# Altium PCB User_Interface.PcbDoc
Units mm, origin at the board's own origin, x right, y up, seen from the top; angles counter-clockwise.
Board outline 102 x 100 mm, 2 copper layers (Top Layer, Bottom Layer); 82 components, 47 nets, 227 pads, 52 vias.
Unrouted connection lines stored in the file: 4.
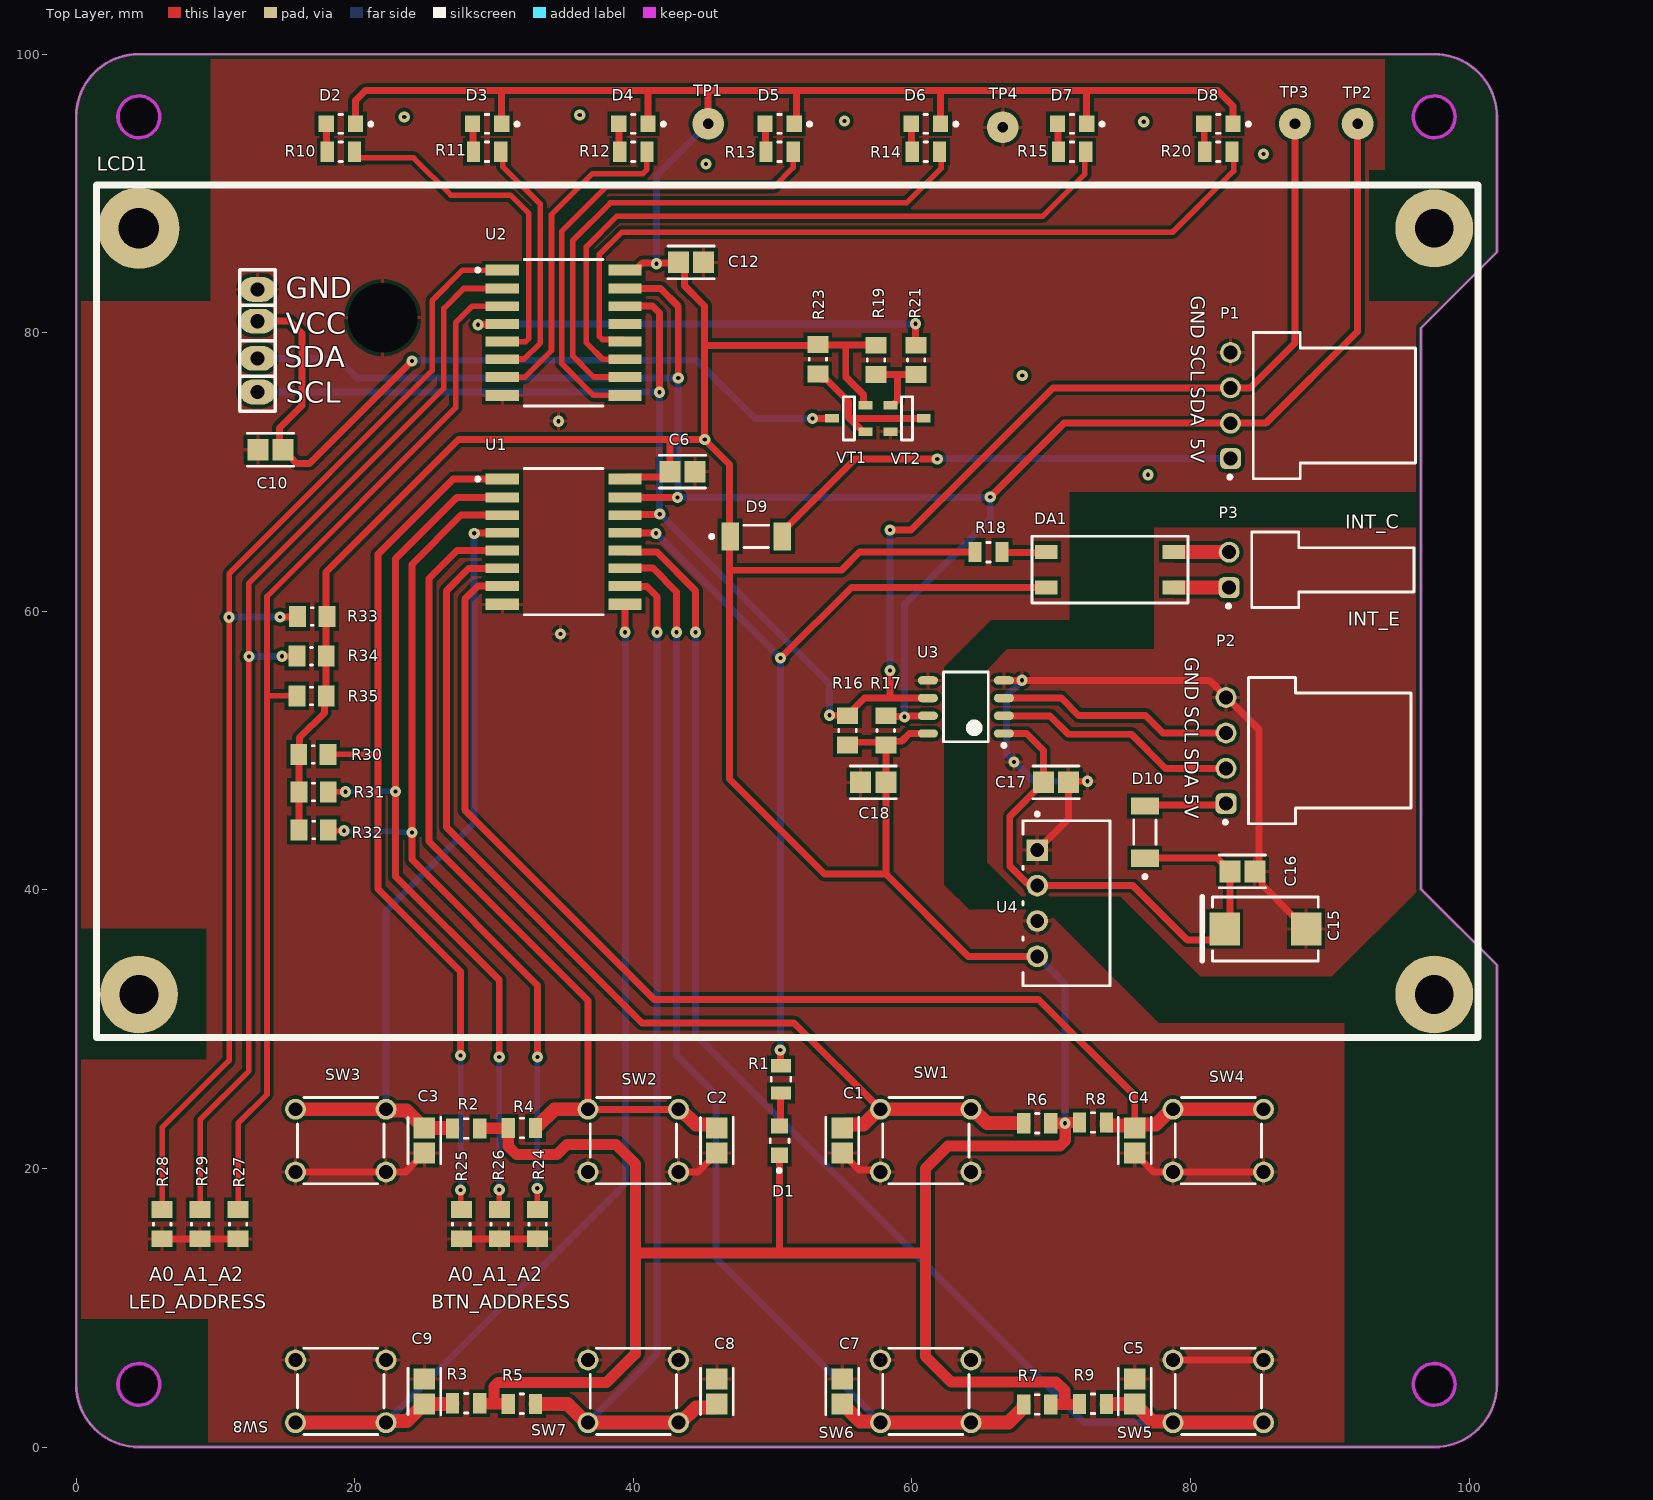
[diagram p0: Top Layer view]
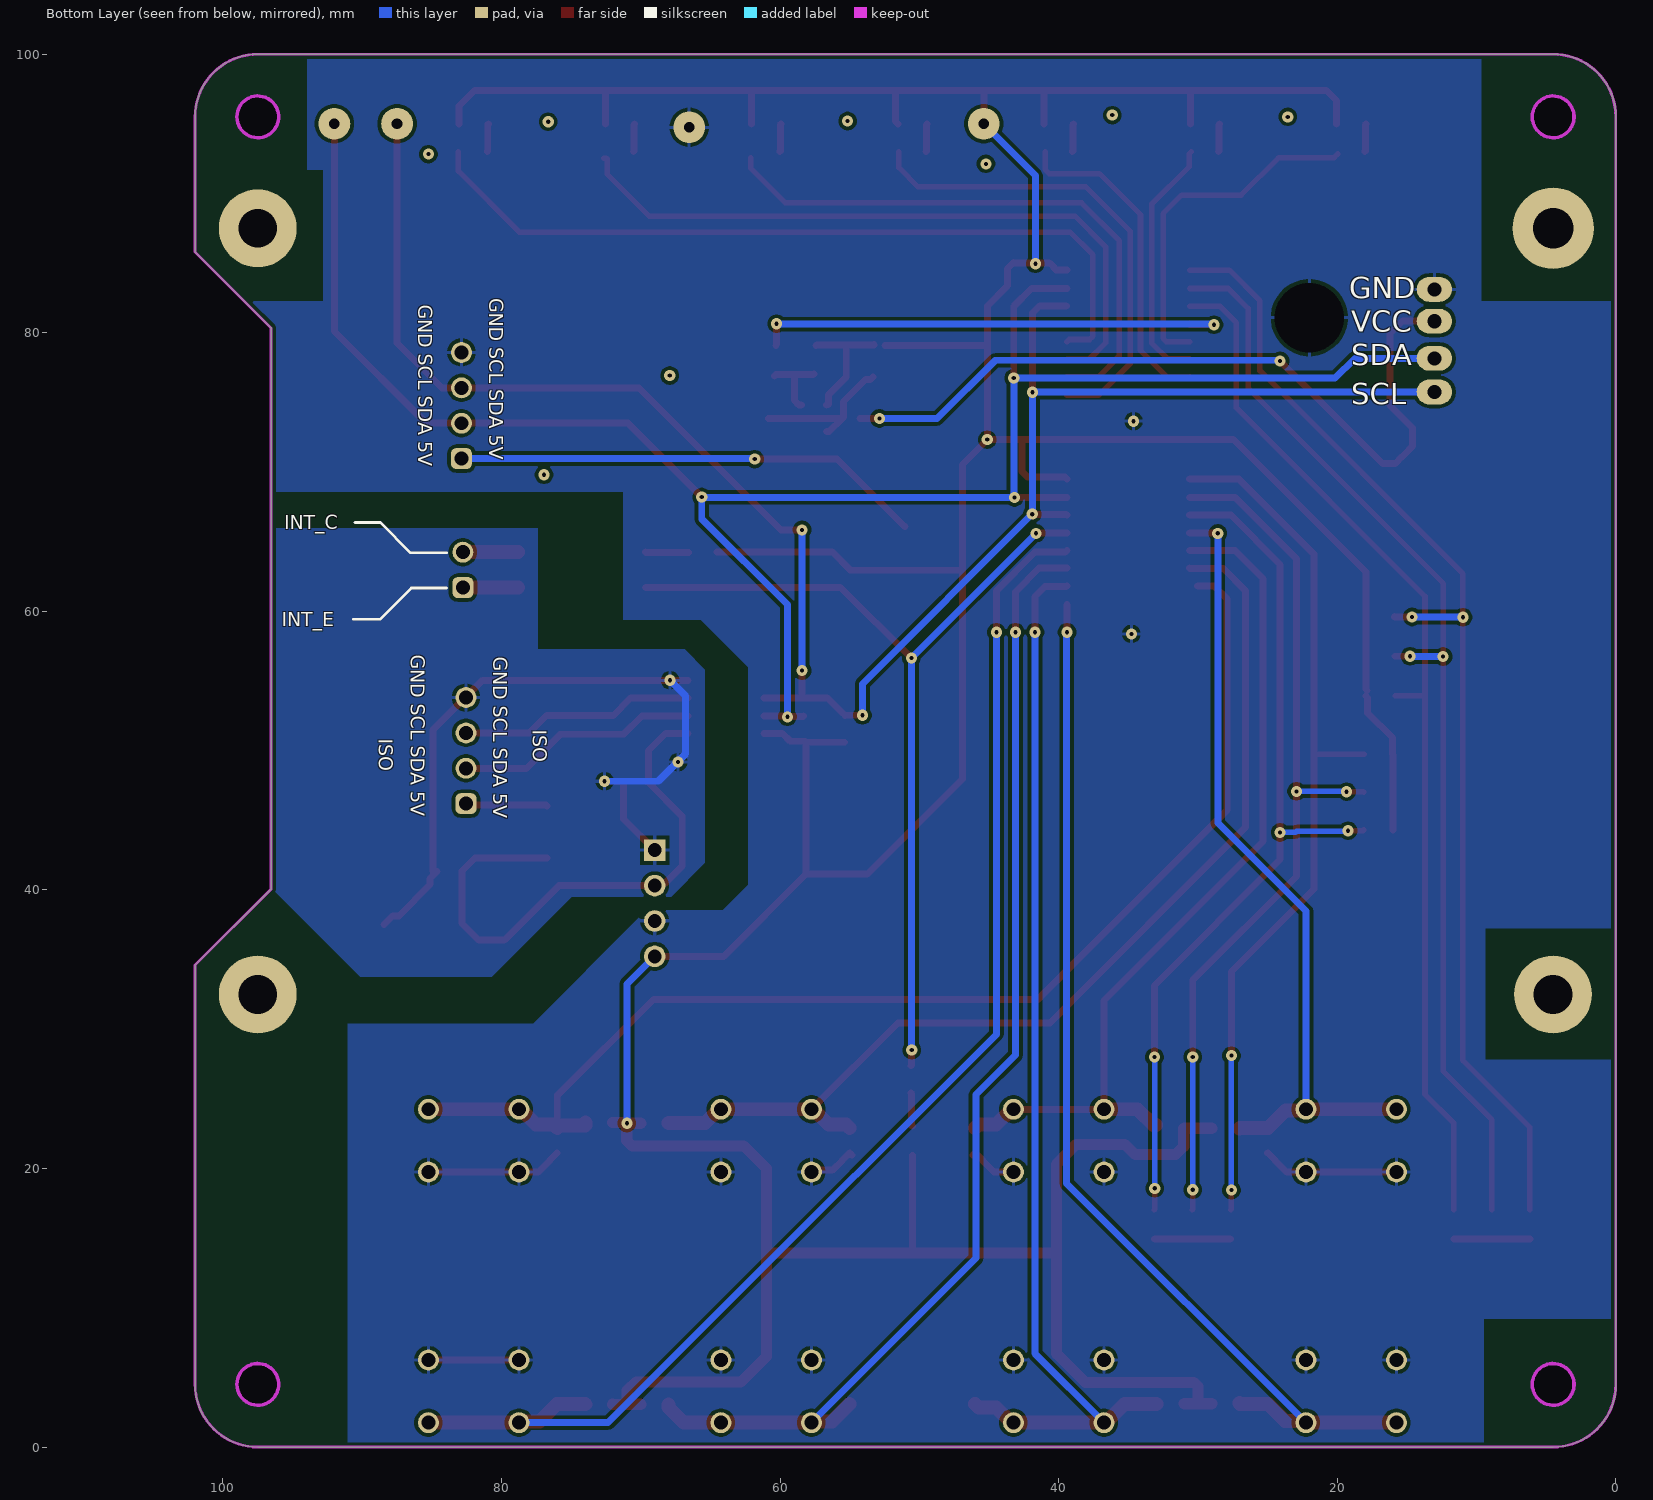
[diagram p1: Bottom Layer view, seen from below]
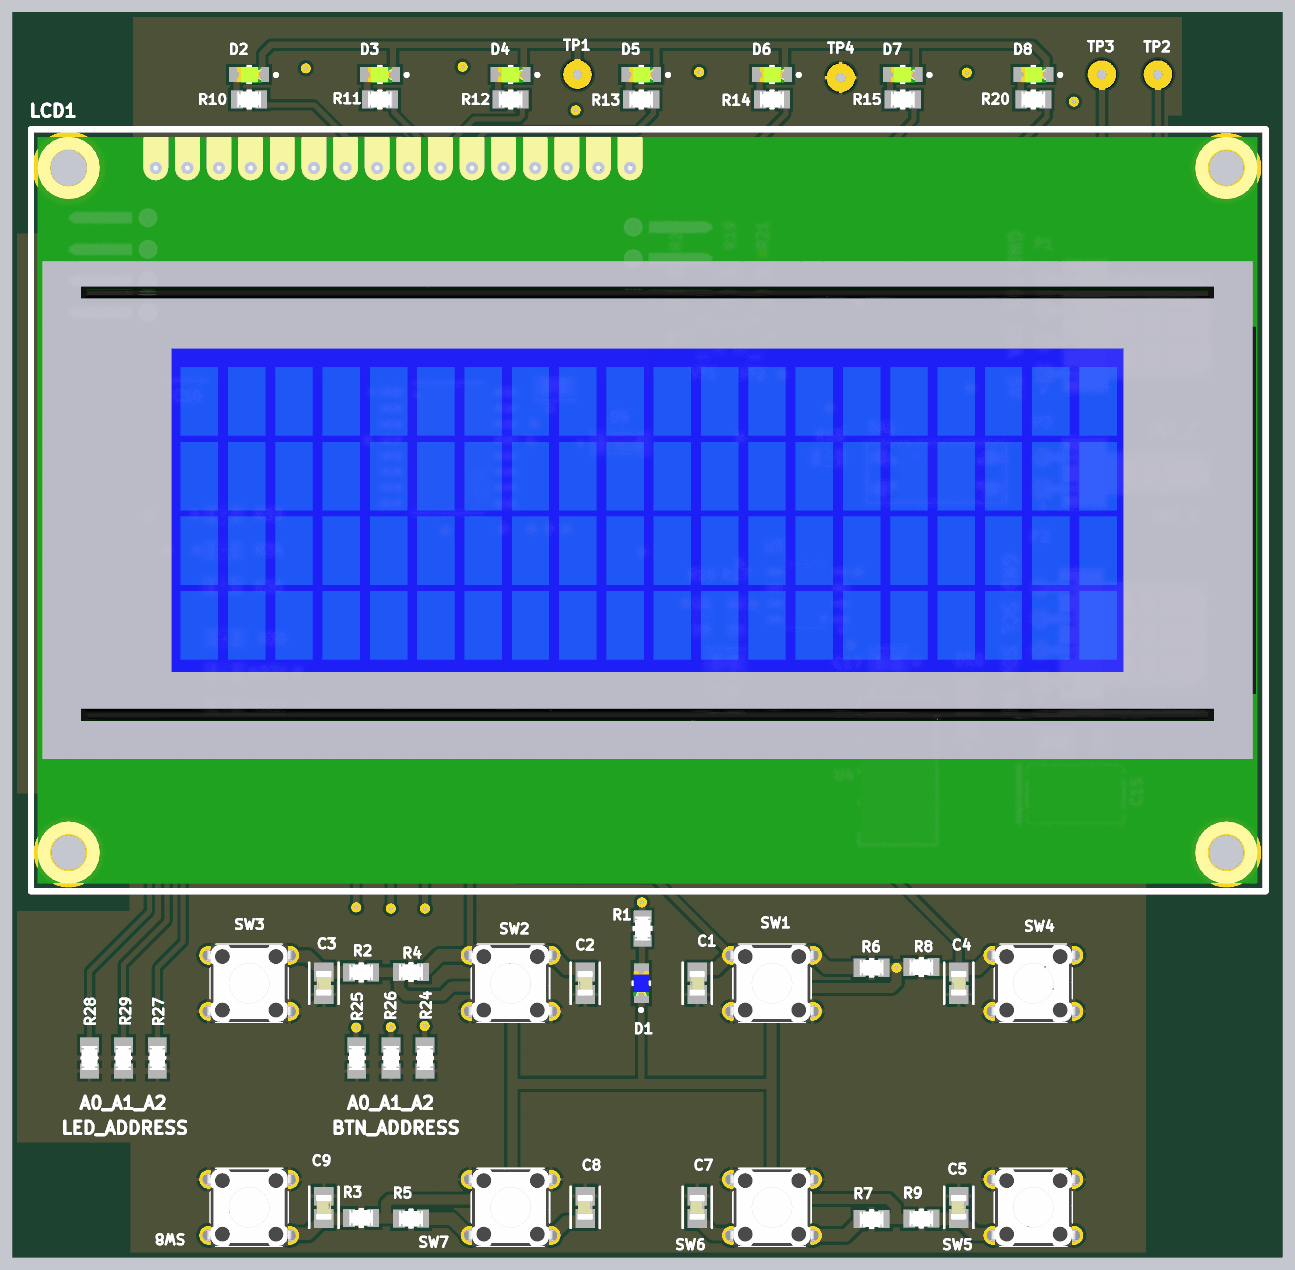
[diagram p2: 3D render of the assembled board from above, using the file's embedded part models]

## Layer stack, top to bottom
Top Solder: solder mask 0.0102, Solder Resist, Dk 3.5
Top Layer: signal copper 0.0356
Dielectric 1: dielectric 0.32, FR-4, Dk 4.8
Bottom Layer: signal copper 0.0356
Bottom Solder: solder mask 0.0102, Solder Resist, Dk 3.5

## Board outline
0,4.5 0,95.5 cw(c4.5,95.5) 4.5,100 97.5,100 cw(c97.5,95.5) 102,95.5 102,85.8 96.55,80.35 96.55,40.05 102,34.6 102,4.5 cw(c97.5,4.5) 97.5,0 4.5,0 cw(c4.5,4.5)
cut-out: 3,95.5 ccw(c4.5,95.5) 4.5,94 ccw(c4.5,95.5) 6,95.5 ccw(c4.5,95.5) 4.5,97 ccw(c4.5,95.5)
cut-out: 96,95.5 ccw(c97.5,95.5) 97.5,94 ccw(c97.5,95.5) 99,95.5 ccw(c97.5,95.5) 97.5,97 ccw(c97.5,95.5)
cut-out: 96,4.5 ccw(c97.5,4.5) 97.5,3 ccw(c97.5,4.5) 99,4.5 ccw(c97.5,4.5) 97.5,6 ccw(c97.5,4.5)
cut-out: 3,4.5 ccw(c4.5,4.5) 4.5,3 ccw(c4.5,4.5) 6,4.5 ccw(c4.5,4.5) 4.5,6 ccw(c4.5,4.5)

## Design rules (kind name [scope] priority, off if disabled: settings)
Clearance [All] p1: gap=0.254 ignorepadtopadclearanceinfootprint=FALSE except(0: Arc-Hole Track-Hole SMDPad-Hole THPad-Hole Via-Hole Fill-Hole Poly-Hole Region-Hole Text-Hole)
PlaneClearance [All] p1: clearance=0.2
PolygonConnect [All] p1: connectstyle=Relief reliefconductorwidth=0.254 reliefentries=4 polygonreliefangle="90 Angle" airgapwidth=0.254
RoutingVias [All] p1: holewidth=0.7 width=1.27 viastyle="Through Hole" minholewidth=0.2 minwidth=0.5 maxholewidth=0.7 maxwidth=1.27
SilkToSilkClearance [All] p1: silktosilkclearance=0.1
SilkToSolderMaskClearance [IsPad] p1: minsilkscreentomaskgap=0.05 clearancetoexposedcopper=FALSE
SolderMaskExpansion [All] p1: expansion=0 istentingtop=FALSE
Width [All] p1: maxlimit=5 minlimit=0.254 preferedwidth=0.5 minimp=50.000000 maximp=50.000000 favimp=50.000000
27 further rules are at their usual default settings.

## Components (designator, comment, footprint, x,y, rotation, side; value= is the part's Value field where it differs from the comment)
C1 "C0805C224K5RACTU" FP-C0805C-DN-IPC_A 55,22 r90 top locked value="0.22 μF"
C2 "C0805C224K5RACTU" FP-C0805C-DN-IPC_A 46,22 r90 top locked value="0.22 μF"
C3 "C0805C224K5RACTU" FP-C0805C-DN-IPC_A 25,22 r90 top locked value="0.22 μF"
C4 "C0805C224K5RACTU" FP-C0805C-DN-IPC_A 76,22 r90 top locked value="0.22 μF"
C5 "C0805C224K5RACTU" FP-C0805C-DN-IPC_A 76,4 r270 top value="0.22 μF"
C6 "C0805C224K5RACTU" FP-C0805C-DN-IPC_A 43.525,70.025 r180 top value="0.22 μF"
C7 "C0805C224K5RACTU" FP-C0805C-DN-IPC_A 55,4 r270 top locked value="0.22 μF"
C8 "C0805C224K5RACTU" FP-C0805C-DN-IPC_A 46,4 r270 top locked value="0.22 μF"
C9 "C0805C224K5RACTU" FP-C0805C-DN-IPC_A 25,4 r270 top value="0.22 μF"
C10 "C0805C224K5RACTU" FP-C0805C-DN-IPC_A 13.95,71.6 r0 top value="0.22 μF"
C12 "C0805C224K5RACTU" FP-C0805C-DN-IPC_A 44.15,85.05 r180 top value="0.22 μF"
C15 "293D106X9050E2TE3" VISH-293D-E_L 85.375,37.2 r0 top
C16 "C0805C224K5RACTU" FP-C0805C-DN-IPC_A 83.724,41.325 r180 top value="0.22 μF"
C17 "C0805C224K5RACTU" FP-C0805C-DN-IPC_A 70.35,47.725 r0 top value="0.22 μF"
C18 "C0805C224K5RACTU" FP-C0805C-DN-IPC_A 57.224,47.725 r180 top value="0.22 μF"
D1 "151031YS06000" LED_BLUE 50.5,22 r90 top
D2 "151031YS06000" LED_GREEN 19,95 r180 top locked
D3 "151031YS06000" LED_GREEN 29.5,95 r180 top locked
D4 "151031YS06000" LED_GREEN 40,95 r180 top locked
D5 "151031YS06000" LED_GREEN 50.5,95 r180 top locked
D6 "151031YS06000" LED_GREEN 61,95 r180 top locked
D7 "151031YS06000" LED_GREEN 71.5,95 r180 top locked
D8 "151031YS06000" LED_GREEN 82,95 r180 top
D9 "LL4448-GS08" FP-6_560-5005_01-4-MFG 48.825,65.375 r0 top value=4pF
D10 "LL4448-GS08" FP-6_560-5005_01-4-MFG 76.725,44.15 r90 top value=4pF
DA1 "PC817" 4-SMD 74.225,62.995 r0 top locked
LCD1 "2004_I2C" LCD2004_I2C 51,60 r0 top locked
P1 "61900411021" 61900411021 90.325,74.775 r90 top
P2 "61900411021" 61900411021 90,50 r90 top locked
P3 "61900211021" 61900211021 90.225,62.975 r90 top
R1 "360" FP-CRCW0805-e3-MFG 50.6,26.4 r90 top
R2 "100K" FP-CRCW0805-e3-MFG 28,22.875 r0 top locked
R3 "100K" FP-CRCW0805-e3-MFG 28,3.15 r0 top locked
R4 "100K" FP-CRCW0805-e3-MFG 32,22.9 r180 top locked
R5 "100K" FP-CRCW0805-e3-MFG 32,3.1 r180 top locked
R6 "100K" FP-CRCW0805-e3-MFG 69,23.25 r0 top locked
R7 "100K" FP-CRCW0805-e3-MFG 69,3.05 r0 top
R8 "100K" FP-CRCW0805-e3-MFG 73,23.3 r180 top locked
R9 "100K" FP-CRCW0805-e3-MFG 73,3.1 r180 top
R10 "360" FP-CRCW0805-e3-MFG 19,93 r0 top locked
R11 "360" FP-CRCW0805-e3-MFG 29.5,93 r0 top locked
R12 "360" FP-CRCW0805-e3-MFG 40,93 r0 top locked
R13 "360" FP-CRCW0805-e3-MFG 50.5,93 r0 top locked
R14 "360" FP-CRCW0805-e3-MFG 61,93 r0 top locked
R15 "360" FP-CRCW0805-e3-MFG 71.5,93 r0 top locked
R16 "1K" Vishay_CRCW0805-e3_IPC_A 55.375,51.45 r270 top locked
R17 "1K" Vishay_CRCW0805-e3_IPC_A 58.125,51.45 r270 top locked
R18 "1k" FP-CRCW0805-e3-MFG 65.5,64.25 r0 top
R19 "10K" Vishay_CRCW0805-e3_IPC_A 57.425,78.05 r90 top
R20 "360" FP-CRCW0805-e3-MFG 82,93 r0 top locked
R21 "1K" Vishay_CRCW0805-e3_IPC_A 60.3,78.05 r90 top
R23 "10K" Vishay_CRCW0805-e3_IPC_A 53.25,78.1 r270 top
R24 "1K" Vishay_CRCW0805-e3_IPC_A 33.125,16 r270 top locked
R25 "1K" Vishay_CRCW0805-e3_IPC_A 27.65,16 r270 top locked
R26 "1K" Vishay_CRCW0805-e3_IPC_A 30.4,16 r270 top locked
R27 "1K" Vishay_CRCW0805-e3_IPC_A 11.625,16 r270 top locked
R28 "1K" Vishay_CRCW0805-e3_IPC_A 6.175,16 r270 top locked
R29 "1K" Vishay_CRCW0805-e3_IPC_A 8.9,16 r270 top locked
R30 "4K7" Vishay_CRCW0805-e3_IPC_A 17.025,49.725 r180 top
R31 "4K7" Vishay_CRCW0805-e3_IPC_A 17.049,47.025 r180 top
R32 "4K7" Vishay_CRCW0805-e3_IPC_A 17.05,44.3 r180 top
R33 "4K7" Vishay_CRCW0805-e3_IPC_A 16.95,59.625 r0 top
R34 "4K7" Vishay_CRCW0805-e3_IPC_A 16.9,56.775 r0 top
R35 "4K7" Vishay_CRCW0805-e3_IPC_A 16.9,53.925 r0 top
SW1 "430156043726" 4301x60437x6 61,22 r180 top locked
SW2 "430156043726" 4301x60437x6 40,22 r180 top locked
SW3 "430156043726" 4301x60437x6 19,22 r180 top locked
SW4 "430156043726" 4301x60437x6 82,22 r180 top locked
SW5 "430156043726" 4301x60437x6 82,4 r0 top locked
SW6 "430156043726" 4301x60437x6 61,4 r0 top locked
SW7 "430156043726" 4301x60437x6 40,4 r0 top locked
SW8 "430156043726" 4301x60437x6 19,4 r0 top locked
TP1 "Test_Point_PCB" Test_Point#1 45.375,96.125 r0 top
TP2 "Test_Point_PCB" Test_Point#2 92,95.85 r0 top
TP3 "Test_Point_PCB" Test_Point#3 87.5,95.975 r0 top
TP4 "Test_Point_PCB" Test_Point#4 66.525,94.75 r0 top
U1 "PCF8574T/3,518" FP-SOT162-1-MFG 35,65 r0 top locked
U2 "PCF8574T/3,518" FP-SOT162-1-MFG 35,80 r0 top locked
U3 "ADuM1250ARZ" ADI-R-8_N 63.875,53.135 r180 top locked
U4 "B0505S-1WR3" FP-B0505S-1WR3-MFG 71.1,39.04 r270 top locked
VT1 "MOSFET-P-CH" SOT23-3 55.475,73.85 r180 top
VT2 "BC847-BEC" SOT23-3 59.65,73.85 r0 top

## Footprints (in the part's own frame and the unit in brackets; to place one, negate y for a bottom-side part, rotate by r counter-clockwise, add the part's x,y. Pads: shape width x height; smd on the part's side, far side on the other; paste and mask are expansions set on the pad)
4-SMD [mm]
  rect 1.6x1 smd: 1(-4.575,1.27) 2(-4.575,-1.27) 3(4.575,-1.27) 4(4.575,1.27)
  silkscreen extent -5.6,-2.4 5.6,2.4, body extent -5,-2.29 5,2.29, height 3.85
4301x60437x6 [mm] "6x6mm Tact Switch, THT version"
  round 1.5 hole 1: A1(-3.25,2.25) A2(3.25,2.25) B1(-3.25,-2.25) B2(3.25,-2.25)
  silkscreen extent -3.1,-3.1 3.1,3.1, body extent -3.95,-3.1 3.95,3.1, height 4.35
61900211021 [mm] "2.54mm Male Left Angled Header Bottom Locking, 2p"
  rrect50% 1.5x1.5 hole 1: 1(-1.27,7.45)
  round 1.5 hole 1: 2(1.27,7.45)
  silkscreen extent -2.72,-5.82 2.71,7.62, body extent -2.54,-5.75 2.54,7.77, height 5.83
61900411021 [mm] "2.54mm Male Left Angled Header Bottom Locking, 4p"
  rrect50% 1.5x1.5 hole 1: 1(-3.81,7.45)
  round 1.5 hole 1: 2(-1.27,7.45) 3(1.27,7.45) 4(3.81,7.45)
  silkscreen extent -5.26,-5.82 5.25,7.62, body extent -5.08,-5.75 5.08,7.77, height 5.83
ADI-R-8_N [mm] "SOIC, 8-Leads, Body 5x4mm, Pitch 1.27mm, IPC Medium Density"
  oval 1.45x0.6 smd: 1(-2.725,1.905) 2(-2.725,0.635) 3(-2.725,-0.635) 4(-2.725,-1.905) 5(2.725,-1.905) 6(2.725,-0.635) 7(2.725,0.635) 8(2.725,1.905)
  silkscreen extent -2.85,-2.5 1.6,2.88, body extent -3,-2.5 3,2.5, height 1.75
FP-6_560-5005_01-4-MFG [mm]
  rect 1.25x2 smd paste+0 mask+0: 1(-1.875,0) 2(1.875,0)
  silkscreen extent -3.32,-0.8 0.87,0.8, body extent -2.6,-1.1 2.6,1.1, height 0.25
FP-B0505S-1WR3-MFG [mm]
  rect 1.55x1.55 hole 1 paste-1000 mask+0: 1(-3.81,-2.1)
  round 1.55 hole 1 paste-1000 mask+0: 2(-1.27,-2.1) 3(1.27,-2.1) 4(3.81,-2.1)
  silkscreen extent -6.52,-3.13 5.92,3.13, body extent -6.02,-3.22 6.02,3.22, height 0.25
FP-C0805C-DN-IPC_A [mm]
  rect 1.505x1.556 smd paste+0 mask+0: 1(-0.901,0) 2(0.901,0)
  silkscreen extent -1.65,-1.18 1.65,1.18, body extent -1,-0.63 1,0.63, height 0.88
FP-CRCW0805-e3-MFG [mm]
  rect 0.95x1.45 smd paste+0 mask+0: 1(-0.975,0) 2(0.975,0)
  silkscreen extent -0.13,-0.7 0.13,0.7, body extent -1.55,-0.82 1.55,0.82, height 0.25
FP-SOT162-1-MFG [mm]
  rect 2.4x0.8 smd paste+0 mask+0: 1(-4.4,4.495) 8(-4.4,-4.495) 9(4.4,-4.495) 16(4.4,4.495)
  rect 2.4x0.7 smd paste+0 mask+0: 2(-4.4,3.175) 3(-4.4,1.905) 4(-4.4,0.635) 5(-4.4,-0.635) 6(-4.4,-1.905) 7(-4.4,-3.175) 10(4.4,-3.175) 11(4.4,-1.905) 12(4.4,-0.635) 13(4.4,0.635) 14(4.4,1.905) 15(4.4,3.175)
  silkscreen extent -6.29,-5.25 2.83,5.25, body extent -5.15,-5.15 5.15,5.15, height 2.65
LCD2004_I2C [mil]
  round 220 hole 110: 0(-1830.71,-1082.68) 0(1830.71,-1082.68) 0(1830.71,1082.68)
  round 230 hole 115: 0(-1830.71,1082.68)
  round 60 hole 196.85 unplated: 0(-1141.73,830)
  oval 100x70 hole 40: 1(-1495,910) 2(-1495,820) 3(-1495,715) 4(-1495,620)
  silkscreen extent -1950,-1205 1955,1205, body extent -1929,-1181 1929,1181, height 1189
LED_BLUE [mm]
  rect 1.1x1.2 smd paste+0 mask+0: 1(-1.05,0) 2(1.05,0)
  silkscreen extent -2.27,-0.67 0.13,0.67, body extent -1,-0.63 1,0.63, height 0.8
LED_GREEN [mm]
  rect 1.1x1.2 smd paste+0 mask+0: 1(-1.05,0) 2(1.05,0)
  silkscreen extent -2.28,-0.67 0.13,0.67, body extent -1,-0.63 1,0.63, height 0.8
SOT23-3 [mm]
  rect 1x0.6 smd: 1(-1.2,0.95) 2(-1.2,-0.95) 3(1.2,0)
  silkscreen extent -0.4,-1.55 0.4,1.55, body extent -1.25,-1.46 1.23,1.46, height 1.02
Test_Point#1 [mil]
  round 90 hole 30 paste+4 mask+4: 1(0,-44.29)
Test_Point#2 [mil]
  round 90 hole 30 paste+4 mask+4: 1(0,-33.46)
Test_Point#3 [mil]
  round 90 hole 30 paste+4 mask+4: 1(0,-38.39)
Test_Point#4 [mil]
  round 90 hole 30 unplated paste+4 mask+4: 1(0,0)
VISH-293D-E_L [mm] "Molded Capacitor, 2-Leads, Body 7.6x4.6mm, IPC High Density"
  rect 2.2x2.35 smd: 1(-2.925,0) 2(2.925,0)
  silkscreen extent -4.52,-2.3 3.8,2.3, body extent -4.02,-2.3 4.02,2.3, height 4.3
Vishay_CRCW0805-e3_IPC_A [mil]
  rect 47.5x59.38 smd paste+0 mask+0: 1(-41.37,0) 2(41.37,0)
  silkscreen extent -3,-25 3,25, body extent -85,-49 85,49, height 10

## Part data
C1 C2 C3 C4 C5 C6 C7 C8 C9 C10 C12 C16 C17 C18: library part CMP-1036-04552-2, "CAP CER 0.22UF 50V X7R 0805", Capacitance="0.22 μF", Manufacturer=KEMET, Package=C0805C-DN, Temperature="-55°C to +125°C", Temperature Characteristic=X7R, Temperature Coefficient=30ppm/°C, Temperature Range High=+125°C, Temperature Range Low=-55°C, Tolerance=0.1, Voltage Rating="50 V", Automotive=No, Category=Cap, ComponentLink2Description=Datasheet, ComponentLink2URL=https://content.kemet.com/datasheets/KEM_C1003_C0G_SMD.pdf, Device Class L1="Passive Components", Device Class L2=Capacitors, Device Class L3="Ceramic Capacitors", Digikey Description="CAP CER 0.22UF 50V X7R 0805", Height=0.88mm, Ipc Land Pattern Name=CAPC200125X78, Lead Free=Yes, Manufacturer Part Number=C0805C224K5RACTU, Material=Ceramic, Mouser Description="CAP CER 0.22UF 50V X7R 0805", Octopart=https://octopart.com/c0805c224k5ractu-kemet-144670, RoHS=TRUE
C15: library part CMP-2000-05556-1, "Tantalum Capacitor, 10 uF, +/- 10%, 50 V, -55 to 125 degC, 2-Pin SMD (7343-43), RoHS, Tape and Reel", Capacitance=10000000pF, Case Code=E, Case Style=Molded, Manufacturer=Vishay, Operating Temp Range=-55Cto125C, Package / Case=7343-43, Package Description="2-Pin Surface Mount Device, Body 7.3 x 4.3 mm", Package Reference=293D-E, Tolerance (+ or -)=10%, Voltage=50VDC, Construction=SMTChip, Datasheet URL=http://www.vishay.com/docs/40002/293d.pdf, Datasheet Version=08/2016, DCL=5uA, DELETED=Compliant, DF=6%, ESR=0.8ohm, Failure Rate=NotRequired, Insulation=NotRequired, Lead Spacing (nom)=NotRequiredmm, Length W/Weld=NotRequiredmm, Length W/Weld (max)=NotRequiredmm, Manufacturer URL=http://www.vishay.com/, Mounting Style=SurfaceMount, Mounting Technology=SurfaceMount, Packaging=TapeandReel, Polarity=Polar, Product Depth (mm)=4.3mm, Product Diameter (mm)=NotRequiredmm, Product Height (mm)=4mm, Product Length (mm)=7.3mm, Rad Hardened=No, Seal=NotRequired, Seated Plane Height=NotRequiredmm, Wire Form=NotRequired
D1 D2 D3 D4 D5 D6 D7 D8: "WURTH ELEKTRONIK - 151031YS06000 - LED, Yellow, Through Hole, T-1 (3mm), 30 mA, 2 V, 590 nm", Manufacturer_Name="Wurth Elektronik", Mouser Part Number=710-151031YS06000, Datasheet Link=https://katalog.we-online.de/led/datasheet/151031YS06000.pdf, Geometry.Height=5.5mm, Manufacturer_Part_Number=151031YS06000, Mouser Price/Stock=https://www.mouser.co.uk/ProductDetail/Wurth-Elektronik/151031YS06000?qs=LlUlMxKIyB3xSYYW%252BcuBiQ%3D%3D
D9 D10: library part CMP-249167-000001-1, "DIODE GEN PURP 75V 150MA SOD80", Capacitance=4pF, Forward Current=300mA, Manufacturer="Vishay Small Signal", Max Junction Temp=+175°C, Max Repetitive Reverse Voltage=100V, Max Surge Forward Current=2A, Package=6.560-5005.01-4, Peak Reverse Current=5uA, Reverse Voltage=75V, Temperature="to +175°C", Automotive=Yes, Automotive Grade="Grade 0", Category=Diode, ComponentLink2Description=Datasheet, ComponentLink2URL=http://www.vishay.com/docs/85557/ll4148.pdf, Device Class L1="Discrete Semiconductors", Device Class L2=Diodes, Device Class L3="Rectifier Diodes", Digikey Description="DIODE GEN PURP 75V 150MA SOD80", Height=1.6mm, Lead Free=Yes, Manufacturer Part Number=LL4448-GS08, Mouser Description="Diodes - General Purpose, Power, Switching 100 Volt 100mA", Octopart=https://octopart.com/ll4448-gs08-vishay+small+signal-40886, RoHS=TRUE, Temperature Range High=+175°C
LCD1: library part LCD2004_I2C
P1 P2: "WR-WTB THT Male Left Angled Bottom Locking Header, pitch 2.54mm, 4pins", Contact Resistance=20mΩ, Manufacturer="Wurth Elektronik", Operating Temperature Max=105°C, Operating Temperature Min=-40°C, Rated Current=3A, Withstanding Voltage=1000VAC, Working Voltage=250VAC, Category="Wire-to-Board Connectors", ComponentLink1Description="Website Link", ComponentLink1URL=https://www.we-online.com/redexpert/article/61900411021?ad, ComponentLink2Description="Datasheet Link", ComponentLink2URL=https://www.we-online.com/redexpert/spec/61900411021?ad, Gender=Male, Height=5.8mm, Length=10.16mm, Manufacturer Part Number=61900411021, Match Code=WR-WTB, Mount="Through Hole", Number of Pins=4, Number of Rows=1, Orientation="Right Angled Bottom Locking", Packaging=Bag, Pitch=2.54mm, Width=12.47mm
P3: "WR-WTB THT Male Left Angled Bottom Locking Header, pitch 2.54mm, 2pins", Contact Resistance=20mΩ, Manufacturer="Wurth Elektronik", Operating Temperature Max=105°C, Operating Temperature Min=-40°C, Rated Current=3A, Withstanding Voltage=1000VAC, Working Voltage=250VAC, Category="Wire-to-Board Connectors", ComponentLink1Description="Website Link", ComponentLink1URL=https://www.we-online.com/redexpert/article/61900211021?ad, ComponentLink2Description="Datasheet Link", ComponentLink2URL=https://www.we-online.com/redexpert/spec/61900211021?ad, Gender=Male, Height=5.8mm, Length=5.08mm, Manufacturer Part Number=61900211021, Match Code=WR-WTB, Mount="Through Hole", Number of Pins=2, Number of Rows=1, Orientation="Right Angled Bottom Locking", Packaging=Bag, Pitch=2.54mm, Width=12.47mm
R1 R10 R11 R12 R13 R14 R15 R18 R20: library part CMP-2001-04908-2, "RES Thick Film, 200Ω, 1%, 0.125W, 100ppm/°C, 0805", Case Code (Imperial)=0805, Case Code (Metric)=2012, Max Operating Temperature=155°C, Min Operating Temperature=-55°C, Package Quantity=5000, Power Rating=125mW, Resistance=10kR, Temperature Coefficient=100ppm/°C, Tolerance=1%, Voltage Rating=150V, Case/Package=0805, Composition="Thick Film", Contact Plating=Tin, Depth=1.25mm, Height=0.45mm, Lead Free="Lead Free", Length=2mm, Military Standard=Not, Packaging="Tape and Reel", Radiation Hardening=No, Termination=SMD/SMT, Voltage Rating (DC)=150V, Weight=0.000194oz, Width=1.25mm
R2 R3 R4 R5 R6 R7 R8 R9: library part CMP-2001-04908-2, "RES Thick Film, 100kΩ, 1%, 0.125W, 100ppm/°C, 0805", Case Code (Imperial)=0805, Case Code (Metric)=2012, Max Operating Temperature=155°C, Min Operating Temperature=-55°C, Package Quantity=5000, Power Rating=125mW, Resistance=10kR, Temperature Coefficient=100ppm/°C, Tolerance=1%, Voltage Rating=150V, Case/Package=0805, Composition="Thick Film", Contact Plating=Tin, Depth=1.25mm, Height=0.45mm, Lead Free="Lead Free", Length=2mm, Military Standard=Not, Packaging="Tape and Reel", Radiation Hardening=No, Termination=SMD/SMT, Voltage Rating (DC)=150V, Weight=0.000194oz, Width=1.25mm
R16 R17 R19 R21 R23 R24 R25 R26 R27 R28 R29 R30 R31 R32 R33 R34 R35: library part CRCW08050000Z0EA
SW1 SW2 SW3 SW4 SW5 SW6 SW7 SW8: "WS-TATV THT Tact Switch 6x6mm, SPST-NO, 12VDC, 50mA, 260g", Manufacturer="Wurth Elektronik", Operating Temperature Max=85°C, Operating Temperature Min=-40°C, Rated Current=50mA, Rated Voltage=12VDC, Category="Tact Switches", Circuit=SPST-NO, ComponentLink1Description="Website Link", ComponentLink1URL=https://www.we-online.com/redexpert/article/430156043726?ad, ComponentLink2Description="Datasheet Link", ComponentLink2URL=https://www.we-online.com/redexpert/spec/430156043726?ad, Contact Material="Stainless Steel", Contact Plating=Silver, Height=4.3mm, Length=6mm, Manufacturer Part Number=430156043726, Match Code=WS-TATV, Mount="Through Hole", Operation Force=260g, Packaging=Bulk, Terminal Material="Copper Alloy", Terminal Plating=Silver, Washable=No, Width=6mm
TP1 TP2 TP3 TP4: library part TP_PCB?, "Test_Point"
U1 U2: library part CMP-10112-000010-1, "IC I/O EXPANDER I2C 8B 16SOIC", Ambient Temperature Range High=+85°C, Ambient Temperature Range Low=-40°C, Frequency=100kHz, Manufacturer="NXP Semiconductors", Max Junction Temp=+125°C, Max Supply Voltage=6V, Min Supply Voltage=2.5V, Nominal Supply Current=40uA, Package=SOT162-1, Temperature="-40°C to +85°C", Automotive=No, Category=IC, ComponentLink2Description=Datasheet, ComponentLink2URL=https://www.nxp.com/docs/en/data-sheet/PCF8574_PCF8574A.pdf, Device Class L1="Integrated Circuits (ICs)", Device Class L2="Interface ICs", Device Class L3="I/O Expanders", Digikey Description="IC I/O EXPANDER I2C 8B 16SOIC", Footprint Url=https://www.nxp.com/docs/en/package-information/SOT162-1.pdf, Height=2.65mm, Interface=I2C, Ipc Land Pattern Name=SOIC127P1032X265-16, Lead Free=Yes, Manufacturer Part Number=PCF8574T/3,518, Mouser Description="PCF8574 Series 2.5 - 6V Remote 8-bit I/O Expander for I2C-bus - SOIC-16", Number Of I/Os=8, Octopart=https://octopart.com/pcf8574t%2F3%2C518-nxp+semiconductors-10470852, RoHS=TRUE, Standoff Height=0.1mm, Temperature Range High=+85°C, Temperature Range Low=-40°C
U3: library part CMP-0534-00654-1, "Hot Swappable, Dual I2C Isolator, 3 to 5.5 V, -40 to 105 degC, 8-Pin SOIC (R-8), RoHS, Tube", Generic Part Number=ADUM1250, Supply Voltage Max="5.5 V", Supply Voltage Min="3 V", Temperature Max="105 degC", Temperature Min="-40 degC", Code_JEDEC=MS-012-AA, ComponentLink1Description="Manufacturer URL", ComponentLink1URL=http://www.analog.com/, ComponentLink2Description=Datasheet, ComponentLink2URL=http://www.analog.com/media/en/technical-documentation/data-sheets/ADUM1250_1251.pdf, Data Rate="1 Mbps", DatasheetVersion="Rev. H", Mounting Technology="Surface Mount", PackageDescription="8-Pin Small Outline Package, Body 4.9 x 3.9 mm, Pitch 1.27 mm", Packing=Tube, PartNumber=ADuM1250ARZ, RoHS=TRUE
U4: library part B0505s-1W, "DC DC Converter 5V 1W"

## Via types
v1: diameter 0.8, hole 0.3, Top Layer to Bottom Layer, 52 vias

## Nets (pads, with @x,y where several pads share a name; then routed paths per layer and width w, separated by ;. In a path a pad name is that pad's centre, name@x,y a point inside that pad or via, vN(x,y) a via of type N, cw(c..) or ccw(c..) an arc to the next point about the centre after c; other vN are vias at no path point)
+5V: C6.2 C12.2 C18.1 D1.1 D2.1 D3.1 D4.1 D5.1 D6.1 D7.1 D8.1 D9.1 R2.2 R3.2 R4.2 R5.2 R6.2 R7.2 R8.2 R9.2 R16.2 R17.2 R18.1 R19.2 R23.1 R30.2 R31.2 R32.2 R33.2 R34.2 R35.2 TP1.1 U1.16 U2.16 U3.8 U4.4 VT1.2 | length 394
  Top Layer w0.5: R32.2 15.999,49.725 16.036,49.762 16.036,50.936 17.814,52.714 17.814,53.788 R35.2 ; R35.2@17.85,54.324 17.951,54.425 R34.2 17.951,62.826 27.45,72.325 v1(45.125,72.325) ; D2.1 20.05,96.675 20.775,97.4 30.575,97.4 ; D3.1 30.55,97.375 30.575,97.4 ; U1.16 39.55,69.645 42.244,69.645 C6.2 42.624,72.324 ; U2.16 40.2,84.495 40.35,84.645 40.35,84.707 40.643,85 v1@41.775,85 ; D4.1 41.05,97.225 41.225,97.4 ; v1(41.675,84.95) 41.756,84.95 41.818,85.012 43.202,85.012 C12.2@43.245,85.054 ; C12.2 43.675,84.624 43.675,83.375 45.125,81.925 45.125,79.1 ; TP1.1 45.375,97.3 45.475,97.4 ; 50.225,13.925 50.5,14.2 D1.1 ; D5.1 51.713,95.162 51.713,97.238 51.875,97.4 ; 52.461,79.1 45.125,79.1 ; R23.1 53.275,79.126 55.25,79.126 ; R16.2@55.375,50.599 58.125,50.599 58.197,50.671 59.271,50.671 59.83,51.23 U3.8 ; VT1.2 56.625,74.85 56.541,74.85 56.541,75.526 55.25,76.817 55.25,79.126 ; R19.2 57.4,79.126 55.25,79.126 ; C18.1 R17.2 ; C18.1@58.139,47.711 58.139,41.136 ; D6.1 62.05,97.375 62.075,97.4 ; R18.1 56.25,64.25 54.95,62.95 46.9,62.95 ; U4.4 64.045,35.23 58.139,41.136 ; D7.1 72.55,97.35 72.6,97.4 ; D8.1 83.05,96.275 81.925,97.4 72.6,97.4 ; 30.575,97.4 41.225,97.4 ; 41.225,97.4 45.475,97.4 ; v1(45.125,72.325) 46.9,70.55 46.9,62.95 ; v1(45.125,72.325) 45.125,79.1 ; 45.475,97.4 51.875,97.4 ; 46.9,62.95 46.9,47.975 53.739,41.136 58.139,41.136 ; 51.875,97.4 62.075,97.4 ; 62.075,97.4 72.6,97.4
  Top Layer w0.8: R3.2@28.987,3.113 30,3.113 ; R2.2@28.987,22.888 31,22.888 31.025,22.863 31.025,21.586 31.611,21 34.525,21 35.25,21.725 38.75,21.725 40.15,20.325 40.15,13.65 ; R5.2@31.012,3.113 30,3.113 ; R6.2@70,23.25 v1(71,23.25) ; 70.675,3.1 70,3.1 69.975,3.075 R7.2 72,3.05 72.025,3.075 R9.2 ; 70.975,3.291 70.975,4.05 70.35,4.675 62.8,4.675 60.975,6.5 60.975,13.925 ; R8.2 71.012,23.3 71.012,22.021 70.616,21.625 62.6,21.625 60.975,20 60.975,13.925 ; 30,3.113 30,4.341 30.284,4.625 38.075,4.625 40.15,6.7 40.15,13.65 ; 40.15,13.65 40.425,13.925 50.225,13.925 60.975,13.925
  Bottom Layer w0.5: v1(41.675,84.95) 41.675,91.3 TP1.1 ; U4.4@68.814,35.436 71,33.25 v1(71,23.25)
+5V_ISO: C15.1 C16.2 C17.1 D10.1 U3.1 U4.2 | length 41.4
  Top Layer w0.5: U3.1 68.22,51.23 69.449,50.001 69.449,47.699 67.025,45.275 67.025,41.725 68.239,40.511 68.799,40.511 U4.2 ; U4.2@69,40.3 75.875,40.3 79.77,36.405 81.655,36.405 82.823,37.573 82.823,41.351 81.899,42.275 D10.1
GND: C1.1 C2.1 C3.1 C4.1 C5.1 C6.1 C7.1 C8.1 C9.1 C10.1 C12.1 C18.2 LCD1.0 LCD1.1 P1.4 R24.2 R25.2 R26.2 R27.2 R28.2 R29.2 SW1.A1 SW1.A2 SW2.A1 SW2.A2 SW3.A1 SW3.A2 SW4.A1 SW4.A2 SW5.A1 SW5.A2 SW6.A1 SW6.A2 SW7.A1 SW7.A2 SW8.A1 SW8.A2 TP4.1 U1.8 U2.8 U3.5 U4.3 VT2.2 | length 44.1
  Top Layer w0.5: R28.2 R29.2 R27.2 ; SW3.A2 23.651,19.75 24.472,20.571 24.472,20.597 24.974,21.099 C3.1 ; R25.2 R26.2 R24.2 ; SW2.A1 44.651,19.75 45.472,20.571 45.472,20.597 45.974,21.099 C2.1 C2.1@46.149,20.95 ; C1.1@54.851,20.95 C1.1 55.026,21.099 55.528,20.597 55.528,20.571 56.224,19.875 57.625,19.875 SW1.A2 ; C4.1 76.026,21.099 76.528,20.597 76.528,20.571 77.349,19.75 SW4.A2 SW4.A1 ; SW5.A1 SW5.A2
  other v1: 34.775,58.375 34.625,73.65
GND_ISO: C15.2 C16.1 C17.2 P2.4 U3.4 U4.1 | length 55.2
  Top Layer w0.5: U3.4 v1@67.9,55.04 ; v1(67.9,55.05) 81.375,55.05 84.925,51.5 C16.1@84.925,41.325 ; U4.1 71.251,45.101 C17.2 71.326,47.8 v1(72.6,47.8) ; C16.1 84.775,41.175 85.127,40.823 85.127,40.373 87.375,38.125 87.825,38.125 C15.2@88.425,37.525
  Bottom Layer w0.5: v1(67.9,55.05) 66.775,53.925 66.775,49.775 68.75,47.8 v1(72.6,47.8)
  other v1: 67.325,49.175
NetC1_2: C1.2 R6.1 SW1.B1 SW1.B2 U1.6 | length 75.2
  Top Layer w0.5: U1.6 30.585,63.08 28.18,63.08 26.575,61.475 26.575,44.5 40.625,30.45 51.55,30.45 SW1.B2
  Top Layer w1: C1.2 55.252,23.153 56.518,23.153 57.615,24.25 SW1.B2 SW1.B1 64.385,24.25 65.385,23.25 R6.1
NetC2_2: C2.2 R4.1 SW2.B1 SW2.B2 U1.5 | length 63
  Top Layer w0.5: U1.5 27.34,64.365 25.325,62.35 25.325,43.475 36.75,32.05 SW2.B2 SW2.B1
  Top Layer w1: R4.1@33,23.125 33.2,23.125 34.325,24.25 SW2.B2 ; SW2.B1 43.385,24.25 44.482,23.153 45.748,23.153 C2.2
NetC3_2: C3.2 R2.1 SW3.B1 SW3.B2 U1.4 | length 57.9
  Top Layer w0.5: v1(28.575,65.6) 28.592,65.617 30.583,65.617 U1.4
  Top Layer w1: SW3.B2 SW3.B1 22.346,24.154 23.721,24.154 24.974,22.901 C3.2 27,22.901 R2.1
  Bottom Layer w0.5: SW3.B1 22.25,38.475 28.575,44.8 v1(28.575,65.6)
NetC4_2: C4.2 R8.1 SW4.B1 SW4.B2 U1.7 | length 88.7
  Top Layer w0.5: U1.7@30.025,61.825 28.85,61.825 27.9,60.875 27.9,45.725 41.5,32.125 69.1,32.125 76,25.225 C4.2
  Top Layer w1: R8.1 73.975,23.125 74,23.1 75.8,23.1 C4.2 76.252,23.153 77.518,23.153 78.615,24.25 SW4.B2 SW4.B1
NetC5_2: C5.2 R9.1 SW5.B1 SW5.B2 U1.12 | length 95.9
  Top Layer w0.5: U1.12 39.5,64.265 41.685,64.265 44.475,61.475 v1(44.475,58.5) v1@44.475,58.4
  Top Layer w1: R9.1@73.975,3.075 73.987,3.087 75.988,3.087 C5.2 76.026,3.099 77.279,1.846 78.654,1.846 SW5.B1 SW5.B2
  Bottom Layer w0.5: v1(44.475,58.5) 44.475,29.625 64.7,9.4 72.35,1.75 SW5.B1
NetC7_2: C7.2 R7.1 SW6.B1 SW6.B2 U1.11 | length 84.4
  Top Layer w0.5: U1.11 41.405,63.095 43.1,61.4 v1@43.1,58.45
  Top Layer w1: C7.2 55.026,3.099 56.279,1.846 57.654,1.846 SW6.B1 SW6.B2 66.925,1.75 68.025,2.85 R7.1
  Bottom Layer w0.5: v1@43.1,58.45 43.1,28.15 45.925,25.325 45.925,13.575 SW6.B1
  other v1: 43.1,58.5
NetC8_2: C8.2 R5.1 SW7.B1 SW7.B2 U1.10 | length 78.3
  Top Layer w0.5: U1.10 39.43,61.795 40.98,61.795 41.7,61.075 v1(41.7,58.5) v1@41.7,58.35
  Top Layer w1: R5.1 35.265,3.1 36.615,1.75 SW7.B1 SW7.B2 43.385,1.75 44.482,2.847 45.748,2.847 C8.2
  Bottom Layer w0.5: SW7.B1 41.7,6.7 v1(41.7,58.5)
NetC9_2: C9.2 R3.1 SW8.B1 SW8.B2 U1.9 | length 77.7
  Top Layer w0.5: v1@39.4,58.45 v1(39.4,58.5) U1.9
  Top Layer w1: SW8.B1 SW8.B2 22.375,1.875 23.75,1.875 24.974,3.099 C9.2 27,3.099 27.025,3.124 R3.1
  Bottom Layer w0.5: SW8.B2 39.425,18.925 39.425,58.425 v1@39.4,58.45
NetC10_2: C10.2 LCD1.2 VT1.3 | length 57.3
  Top Layer w0.5: LCD1.2 15.322,80.828 16.2,79.95 16.2,74.775 14.6,73.175 14.6,71.851 C10.2 14.851,71.574 15.353,71.072 15.379,71.072 15.826,70.625 16.75,70.625 v1(24.1,77.975) ; v1(52.875,73.85) VT1.3
  Bottom Layer w0.5: v1(24.1,77.975) 24.15,78.025 44.55,78.025 48.725,73.85 v1(52.875,73.85)
NetD1_2: D1.2 R1.1 | length 2.4
  Top Layer w0.5: D1.2 50.55,23.1 50.55,25.375 R1.1
NetD2_2: D2.2 R10.1 | length 2
  Top Layer w0.5: D2.2 17.988,94.962 17.988,93.037 R10.1
NetD3_2: D3.2 R11.1 | length 2
  Top Layer w0.5: D3.2 28.487,94.962 28.487,93.037 R11.1
NetD4_2: D4.2 R12.1 | length 2
  Top Layer w0.5: D4.2 38.987,94.962 38.987,93.037 R12.1
NetD5_2: D5.2 R13.1 | length 2
  Top Layer w0.5: D5.2 49.488,94.962 49.488,93.037 R13.1
NetD6_2: D6.2 R14.1 | length 2
  Top Layer w0.5: D6.2 59.988,94.962 59.988,93.037 R14.1
NetD7_2: D7.2 R15.1 | length 2
  Top Layer w0.5: D7.2 70.487,94.962 70.487,93.037 R15.1
NetD8_2: D8.2 R20.1 | length 2
  Top Layer w0.5: D8.2 80.988,94.962 80.988,93.037 R20.1
NetD9_2: D9.2 P1.1 | length 33.9
  Top Layer w0.5: D9.2@51.034,66.084 51.075,66.125 51.099,66.125 55.924,70.95 61.8,70.95 v1(61.825,70.925)
  Bottom Layer w0.5: v1(61.825,70.925) 61.865,70.965 P1.1
NetD10_2: D10.2 P2.1 | length 5.9
  Top Layer w0.5: D10.2 76.807,46.107 82.468,46.107 P2.1
NetDA1_1: DA1.1 R18.2 | length 3.1
  Top Layer w0.5: R18.2@66.557,64.233 69.618,64.233 DA1.1
NetDA1_2: DA1.2 R1.2 U1.13 | length 65.4
  Top Layer w0.5: U1.13 39.418,65.617 41.608,65.617 v1(41.625,65.6) ; v1(50.55,28.5) 50.575,28.475 50.575,27.4 R1.2 ; v1(50.575,56.65) 55.65,61.725 DA1.2
  Bottom Layer w0.5: v1(41.625,65.6) v1(50.575,56.65) 50.575,28.525 v1(50.55,28.5)
NetDA1_3: DA1.3 P3.1 | length 4
  Top Layer w0.5: DA1.3 DA1.3@78.81,61.715 ; P3.1@82.765,61.715 P3.1
  Top Layer w1: DA1.3@78.81,61.715 P3.1@82.765,61.715
NetDA1_4: DA1.4 P3.2 | length 4
  Top Layer w0.5: DA1.4 DA1.4@78.81,64.255 ; P3.2@82.765,64.255 P3.2
  Top Layer w1: DA1.4@78.81,64.255 P3.2@82.765,64.255
NetLCD1_3: LCD1.3 P1.2 R17.1 TP2.1 U1.15 U2.15 U3.7 | length 142.5
  Top Layer w0.5: U1.15 v1(43.175,68.175) ; U2.15 41.95,83.175 43.225,81.9 v1(43.225,76.75) ; R17.1@58.326,52.5 58.363,52.463 59.437,52.463 v1(59.475,52.425) 59.531,52.481 61.131,52.481 U3.7 ; v1(65.625,68.2) 70.93,73.505 P1.2 85.405,73.505 92,80.1 TP2.1
  Bottom Layer w0.5: LCD1.3 18.739,78.161 20.15,76.75 v1(43.225,76.75) 43.2,76.725 43.2,68.2 v1@43.187,68.187 ; v1(43.175,68.175) v1@43.187,68.187 ; v1(59.475,52.425) 59.475,60.475 65.625,66.625 v1(65.625,68.2) 65.612,68.187 v1@43.187,68.187
NetLCD1_4: LCD1.4 P1.3 R16.1 TP3.1 U1.14 U2.14 U3.6 | length 137.9
  Top Layer w0.3: U2.14 U2.14@39.422,81.927 ; R16.1@55.351,52.525 R16.1
  Top Layer w0.5: U1.14 39.435,66.94 41.865,66.94 v1(41.9,66.975) ; U2.14@39.422,81.927 39.435,81.915 U2.14@40.24,81.915 ; U2.14@40.24,81.905 41.382,81.905 41.875,81.412 v1(41.875,75.725) ; v1(54.087,52.538) 55.338,52.538 R16.1@55.351,52.525 ; R16.1@55.526,52.701 56.595,53.77 58.5,53.77 ; v1(58.425,55.75) 58.425,53.845 58.5,53.77 ; v1(58.425,65.85) 59.95,65.85 70.145,76.045 P1.3 84.27,76.045 87.5,79.275 TP3.1 ; U3.6 58.5,53.77
  Bottom Layer w0.5: LCD1.4 13.239,75.748 13.45,75.748 13.457,75.741 41.859,75.741 v1(41.875,75.725) 41.888,75.712 41.888,66.987 v1(41.9,66.975) 54.087,54.788 v1(54.087,52.538) ; v1(58.425,55.75) v1(58.425,65.85)
NetP2_2: P2.2 U3.2 | length 17.5
  Top Layer w0.5: U3.2 69.925,52.5 71.25,51.175 75.775,51.175 78.22,48.73 P2.2
NetP2_3: P2.3 U3.3 | length 17
  Top Layer w0.5: U3.3 70.73,53.77 71.972,52.528 76.772,52.528 78.03,51.27 P2.3
NetR10_2: R10.2 U2.5 | length 25.2
  Top Layer w0.4: R10.2@19.975,92.834 20.25,92.559 24.216,92.559 26.9,89.875 31.175,89.875 32.5,88.55 32.5,79.599 32.266,79.365 U2.5
NetR11_2: R11.2 U2.6 | length 18.1
  Top Layer w0.4: R11.2 30.637,92.838 30.637,91.913 33.325,89.225 33.325,79.275 32.166,78.116 30.621,78.116 U2.6
NetR12_2: R12.2 U2.7 | length 23.6
  Top Layer w0.4: U2.7 30.625,76.8 32.2,76.8 34.125,78.725 34.125,88.475 37.075,91.425 40.682,91.425 40.975,91.718 R12.2
NetR13_2: R13.2 U2.9 | length 34.6
  Top Layer w0.4: U2.9 37.145,75.505 34.875,77.775 34.875,87.3 38.05,90.475 50.1,90.475 51.475,91.85 R13.2
NetR14_2: R14.2 U2.10 | length 42
  Top Layer w0.4: U2.10 37.15,76.825 35.65,78.325 35.65,86.625 38.35,89.325 59.625,89.325 62.114,91.814 R14.2@62.114,92.564
NetR15_2: R15.2 U2.11 | length 49.5
  Top Layer w0.4: U2.11 37.805,78.095 36.625,79.275 36.625,86.175 38.825,88.375 69.4,88.375 72.4,91.375 72.4,92.475 72.467,92.542 R15.2@72.667,92.542
NetR19_1: R19.1 R21.1 VT2.1 | length 5.4
  Top Layer w0.5: R19.1@57.575,77.024 57.6,76.999 58.975,76.999 ; VT2.1 58.65,74.8 58.75,74.9 58.75,74.909 58.975,75.134 58.975,76.999 ; R21.1@60.403,76.896 R21.1 58.975,76.999
NetR20_2: R20.2 U2.12 | length 57.3
  Top Layer w0.4: U2.12 39.25,79.515 37.784,79.515 37.55,79.749 37.55,85.6 39.175,87.225 78.725,87.225 83.1,91.6 R20.2@83.1,93
NetR21_2: R21.2 U2.4 | length 34.8
  Top Layer w0.5: v1(28.85,80.575) 28.88,80.605 30.57,80.605 U2.4 ; v1(60.25,80.65) 60.25,79.151 R21.2
  Bottom Layer w0.5: v1(28.85,80.575) 28.888,80.613 60.212,80.613 v1(60.25,80.65)
NetR23_2: R23.2 VT1.1 VT2.3 | length 11
  Top Layer w0.5: R23.2@53.325,76.825 53.504,76.646 53.854,76.646 55.45,75.05 55.45,73.925 55.525,73.85 ; VT1.1 56.475,72.9 55.525,73.85 ; VT2.3 55.525,73.85
NetR24_1: R24.1 R32.1 U1.3 | length 64.1
  Top Layer w0.4: R32.1 18.151,44.25 v1(19.225,44.25) ; v1(33.1,18.575) 33.1,17.076 R24.1
  Top Layer w0.5: U1.3 27.63,66.905 24.1,63.375 24.1,42.175 33.125,33.15 v1(33.125,28)
  Bottom Layer w0.4: v1(19.225,44.25) 19.25,44.225 22.9,44.225 23,44.125 v1(24.1,44.125) ; v1(33.1,18.575) 33.1,27.975 v1(33.125,28)
NetR25_1: R25.1 R30.1 U1.1 | length 64.3
  Top Layer w0.4: R30.1 21.6,49.725 21.675,49.8 ; v1(27.6,18.45) 27.6,17.101 R25.1
  Top Layer w0.5: v1(27.6,28.1) 27.6,34.15 21.675,40.075 21.675,49.8 21.675,64.1 27.07,69.495 U1.1
  Bottom Layer w0.4: v1(27.6,18.45) v1(27.6,28.1)
NetR26_1: R26.1 R31.1 U1.2 | length 64.1
  Top Layer w0.4: R31.1 18.125,47.05 v1(19.325,47.05) ; v1(30.375,18.475) 30.375,17.076 R26.1
  Top Layer w0.5: v1(30.375,28) 30.375,33.525 22.925,40.975 v1(22.925,47.075) 22.925,63.775 27.325,68.175 U1.2
  Bottom Layer w0.4: v1@19.35,47.075 v1(22.925,47.075) ; v1(30.375,18.475) v1(30.375,28)
NetR27_1: R27.1 R35.1 U2.3 | length 76.1
  Top Layer w0.4: R27.1 11.625,23.25 13.7,25.325 13.7,53.95 ; R35.1 13.725,53.925 13.7,53.95 ; U2.3 28.43,81.905 27.25,80.725 27.25,74.625 13.7,61.075 13.7,53.95
NetR28_1: R28.1 R33.1 U2.1 | length 84.2
  Top Layer w0.4: R28.1 6.175,22.95 10.975,27.75 v1(10.975,59.575) 10.975,62.7 25.55,77.275 25.55,82.3 27.745,84.495 U2.1
  Top Layer w0.5: v1(14.625,59.6) 15.874,59.6 R33.1
  Bottom Layer w0.5: v1(10.975,59.575) 10.987,59.587 14.612,59.587 v1(14.625,59.6)
NetR29_1: R29.1 R34.1 U2.2 | length 80.2
  Top Layer w0.4: R29.1 8.9,23.5 12.4,27 v1(12.4,56.75) 12.375,56.775 12.375,62 26.4,76.025 26.4,81.75 27.825,83.175 U2.2
  Top Layer w0.5: v1(14.775,56.775) R34.1
  Bottom Layer w0.5: v1(12.4,56.75) 12.412,56.763 14.763,56.763 v1(14.775,56.775)
pads on no net: U2.13
copper on no net:
  other v1: 76.95,69.8 67.925,76.925 45.225,92.125 85.25,92.825 76.65,95.15 55.15,95.2 23.55,95.5 36.15,95.625

## Polygon pours and split planes (outlines as drawn)
GND on Top Layer "NONET_L-01_P-001" (solid, remove dead copper, pour order 1): -0.45,0.057 -0.45,100.057 101.55,100.057 101.55,0.057
GND_ISO on Top Layer "NONET_L-01_P-001" (solid, pour order 3): 65.4,55.818 65.4,41.95 67.825,39.525 74.95,39.525 80.7,33.775 90.15,33.775 96.475,40.1 96.475,65.984 77.385,65.984 77.385,57.284 66.857,57.275
GND on Bottom Layer "NONET_L-01_P-001" (solid, remove dead copper, pour order 0): 0,0 0,100 102,100 102,0
GND_ISO on Bottom Layer "NONET_L-01_P-001" (solid, pour order 2): 65.4,55.818 65.4,41.95 67.825,39.525 74.95,39.525 80.7,33.775 90.15,33.775 96.475,40.1 96.475,65.984 77.385,65.95 77.385,57.275 66.857,57.275

## Keep-outs
Keep-Out Layer:
  circle w0.254: c4.5,95.5 r1.5
  circle w0.254: c97.5,95.5 r1.5
  circle w0.254: c4.5,4.5 r1.5
  circle w0.254: c97.5,4.5 r1.5
  lines w0.2: 0,4.5 ccw(c4.5,4.5) 4.5,0 97.5,0 ccw(c97.5,4.5) 102,4.5 102,34.6 96.55,40.05 96.55,80.35 102,85.8 102,95.5 ccw(c97.5,95.5) 97.5,100 4.5,100 ccw(c4.5,95.5) 0,95.5 0,4.5

## Other copper
Top Layer:
  pour cut-out: 92.812,82.275 93.013,82.275 110.538,82.275 110.538,90.5 110.538,91.7 92.812,91.7
  pour cut-out: 91.05,31.433 91.05,0.059 100.617,0.059 101.817,0.059 101.817,42.2
  pour cut-out: 93.95,100 93.95,99.8 93.95,82.275 102.175,82.275 103.375,82.275 103.375,100
  pour cut-out: 0.225,99.975 0.225,99.775 0.225,82.25 8.45,82.25 9.65,82.25 9.65,99.975
  pour cut-out: 0.05,9.225 0.05,0 9.475,0 9.475,9.225
  pour cut-out: 0.075,37.25 0.075,27.8 9.375,27.8 9.375,37.25
  pour cut-out: 96.485,40.109 90.16,33.784 80.71,33.784 74.96,39.534 67.835,39.534 65.16,42.209 65.16,55.578 66.866,57.284 77.385,57.284 77.385,65.984 96.485,65.984 96.485,68.584 71.285,68.584 71.285,59.409 65.71,59.409 62.285,55.984 62.285,40.384 64.11,38.559 68.435,38.559 69.585,38.559 77.735,30.409 91.235,30.409 98.71,37.884
Bottom Layer:
  pour cut-out: 92.812,82.275 93.013,82.275 110.538,82.275 110.538,90.5 110.538,91.7 92.812,91.7
  pour cut-out: 91.05,31.433 91.05,0.059 100.617,0.059 101.817,0.059 101.817,42.2
  pour cut-out: 93.95,100 93.95,99.8 93.95,82.275 102.175,82.275 103.375,82.275 103.375,100
  pour cut-out: 0.225,99.975 0.225,99.775 0.225,82.25 8.45,82.25 9.65,82.25 9.65,99.975
  pour cut-out: 0.075,37.25 0.075,27.8 9.375,27.8 9.375,37.25
  pour cut-out: 0.05,9.225 0.05,0 9.475,0 9.475,9.225
  pour cut-out: 96.475,40.1 90.15,33.775 80.7,33.775 74.95,39.525 67.825,39.525 65.15,42.2 65.15,55.568 66.857,57.275 77.375,57.275 77.375,65.975 96.475,65.975 96.475,68.575 71.275,68.575 71.275,59.4 65.7,59.4 62.275,55.975 62.275,40.375 64.1,38.55 68.425,38.55 69.575,38.55 77.725,30.4 91.225,30.4 98.7,37.875

## Silkscreen, mask and mechanical layers (free items; w line width, h text height)
Top Overlay:
  text "GND SCL SDA  5V" at 80.004,82.646 h1 r270
  text "INT_C" at 91.104,65.921 h1
  text "INT_E" at 91.279,58.971 h1
  text "GND SCL SDA 5V" at 79.604,56.696 h1 r270
  text "A0_A1_A2" at 5.229,11.921 h1
  text "A0_A1_A2" at 26.729,11.921 h1
  text "LED_ADDRESS" at 3.779,9.921 h1
  text "BTN_ADDRESS" at 25.504,9.921 h1
Bottom Overlay:
  lines w0.2: 83.95,61.675 86.475,61.675 88.725,59.425 90.65,59.425 ; 83.95,64.2 86.525,64.2 88.7,66.375 90.525,66.375
  text "GND SCL SDA 5V" at 80.871,82.471 h1 r90
  text "GND SCL SDA 5V" at 85.996,81.996 h1 r90
  text "INT_C" at 95.596,65.896 h1
  text "INT_E" at 95.771,58.946 h1
  text "GND SCL SDA 5V" at 86.521,56.871 h1 r90
  text "GND SCL SDA 5V" at 80.596,56.721 h1 r90
  text "ISO" at 77.746,51.496 h1 r90
  text "ISO" at 88.821,50.846 h1 r90
Top Component Outline:
  lines w1: 24.748,5.153 25.252,4.648

## Text inside footprints (layer, text, board x,y; h text height)
LCD1: Bottom Overlay "VCC" at 18.996,80.066 h1.52; Bottom Overlay "SDA" at 18.996,77.653 h1.52; Bottom Overlay "GND" at 19.123,82.479 h1.52; Bottom Overlay "SCL" at 18.996,74.859 h1.52; Top Overlay "SDA" at 14.932,77.526 h1.52; Top Overlay "VCC" at 15.059,79.939 h1.52; Top Overlay "GND" at 15.059,82.479 h1.52; Top Overlay "SCL" at 15.059,74.986 h1.52